# Altium PCB Board3ph.PcbDoc (part 2 of 4)
Units mil, origin at the board's own origin, x right, y up, seen from the top; angles counter-clockwise.
Board outline 2522.05 x 3126.78 mil, 4 copper layers (Top Layer, Mid Layer, Mid Layer 2, Bottom Layer), stack 61.653 mil thick; 132 components, 105 nets, 468 pads, 161 vias.
Unrouted connection lines stored in the file: 3.
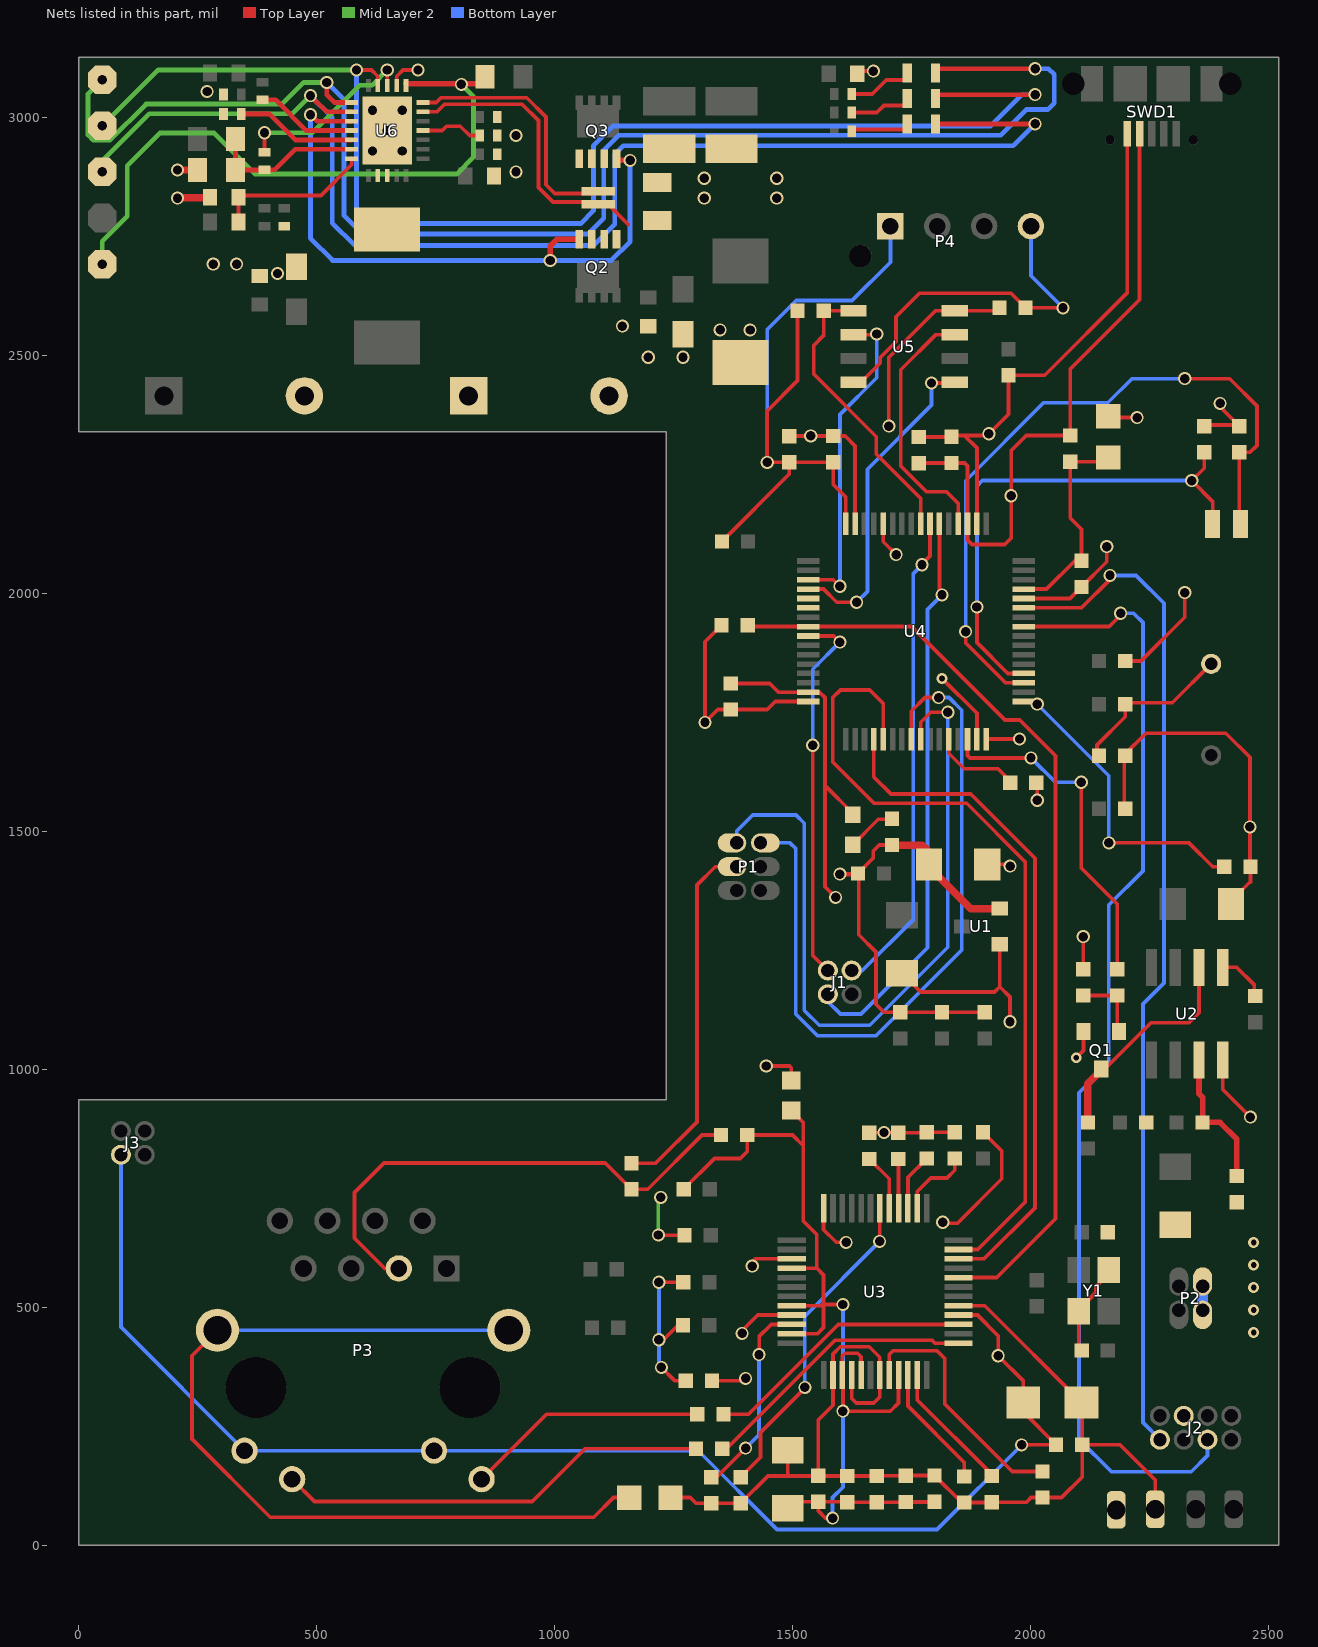
[diagram p4: the nets of this part, all layers, seen from the top]

## Part data (continued)
P3: "CONN MAGJACK 1PORT 100 BASE-T", Supplier Part Number 1=1278-1011-ND, Temperature="0°C to +70°C", Temperature Range High=+70°C, Temperature Range Low=0°C, ComponentLink1Description=Upverter, ComponentLink1URL=https://upverter.com/upn/revision/a90ddcab053b3c09/, ComponentLink2Description=Datasheet, ComponentLink2URL=http://www.shopwiznet.com/lanotattachments/download/file/id/95/store/1/, RoHS=TRUE, Supplier 1=Digi-Key, Supplier 2=Mouser, Supplier Part Number 2=950-RB1-125BAG1A
P4: "Connector Header Through Hole 4 position 0.098\" (2.50mm)", Manufacturer=Molex, Manufacturer Part Number=207843-0004, Supplier Part Number 1=900-2078430004-ND, Supplier 1=Digi-Key, Supplier Packaging 1=Tray, Supplier Unit Price 1=$0.43
Q1: "MOSFET N-CH 60V 115MA SOT23-3", Manufacturer_Name="Diodes Inc.", Manufacturer_Part_Number=DMN65D8L-7, Mouser Part Number=621-DMN65D8L-7, Supplier Part Number 1=2N7002E-T1-E3CT-ND, Datasheet Link=https://www.diodes.com/assets/Datasheets/DMN65D8L.pdf, Height=1mm, Supplier 1=Digi-Key
Q2 Q3: "MOSFET N-CH 40V 40A PPAK1212-8", LCSC Part Number=C511037, Manufacturer="Vishay Semiconductors", ComponentLink1Description=https://datasheet.ciiva.com/24101/sis488dn-267694-24101036.pdf?src-supplier=Mouser, ComponentLink1URL=https://datasheet.ciiva.com/24101/sis488dn-267694-24101036.pdf?src-supplier=Mouser, ComponentLink2Description=https://datasheet.ciiva.com/29742/sis488dn-29742161.pdf?src-supplier=Digikey, ComponentLink2URL=https://datasheet.ciiva.com/29742/sis488dn-29742161.pdf?src-supplier=Digikey, Item Type=MOSFETs, Manufacturer Part Number=SIS488DN-T1-GE3, Pricing="1=1.0926, 10=1.0325, 25=0.9922, 50=0.9525, 100=0.9137, 250=0.9045, 500=0.8952, 1000=0.8863 (USD)", RoHS=Yes, Stock=2575, Supplier="Arrow Electronics"
R1: library part R-1608, "0 Ohms Jumper 0.1W, 1/10W Chip Resistor 0603 (1608 Metric) Moisture Resistant Thick Film", Case Code (Metric)=1608, Manufacturer=Yageo, Manufacturer Part Number=RC0603JR-070RL, Power Rating=100mW, Supplier Part Number 1=311-0.0GRDKR-ND, Temperature Coefficient=200ppm/°C, Tolerance=1%, Voltage Rating=50V, Category="Chip SMD Resistors", Composition="Thick Film", Supplier 1=Digi-Key, Supplier Unit Price 1=$0.00347
R2: library part "22K Ohm 0.5% 1/16W 0603", "RES SMD 22K OHM 0.5% 1/16W 0603", Case Code (Metric)=1608, Manufacturer=Susumu, Manufacturer Part Number=RR0816P-223-D, Max Power Dissipation=63mW, Power Rating=62.5mW, Resistance=22kR, Supplier Part Number 1=RR08P22.0KDCT-ND, Temperature Coefficient=25ppm/°C, Tolerance=0.5%, Voltage Rating=75V, Category="Chip SMD Resistors", Supplier 1=Digi-Key, Supplier Unit Price 1=$0.01237
R3: library part RES, "Gen Purp Chip, R0603 0.1W 5%", Case Code (Metric)=1608, Manufacturer="TE Connectivity", Manufacturer Part Number=CRGCQ0603J330R, Max Power Dissipation=100mW, PartNumber=ERJ3GEYJ101V, Supplier Part Number 1=A130088CT-ND, Temperature Coefficient=100ppm/°C, Voltage=75, ComponentLink1Description=https://www.te.com/commerce/DocumentDelivery/DDEController?Action=srchrtrv&amp;DocNm=1773204-3&amp;DocType=DS&amp;DocLang=English&src-supplier=Digi-Key, ComponentLink1URL=https://www.te.com/commerce/DocumentDelivery/DDEController?Action=srchrtrv&amp;DocNm=1773204-3&amp;DocType=DS&amp;DocLang=English&src-supplier=Digi-Key, Component SubKind=Resistor, Component Type=Standard, Composition="Thick Film", Material=Thick-Film, MetricFootprint=R1608MM, Pin Count=2, Published=7/16/2009, Publisher=AltiumDBManager1.1, Resistance=330R, RoHS=Yes, Supplier 1=Digi-Key, Watts=0.1W
R4 R6: library part RES1, "RES SMD 100K OHM 1% 1/4W 0603", Case Code (Metric)=1608, Manufacturer="Vishay Dale", Manufacturer Part Number=RCA0603100KFKEAHP, Max Power Dissipation=250mW, Resistance=100kR, Supplier Part Number 1=541-3247-1-ND, Temperature Coefficient=100ppm/°C, Tolerance=1%, ComponentLink1Description=http://www.vishay.com/docs/20067/rcahp.pdf?src-supplier=Digi-Key, ComponentLink1URL=http://www.vishay.com/docs/20067/rcahp.pdf?src-supplier=Digi-Key, Composition="Thick Film", Supplier 1=Digi-Key, Supplier Unit Price 1=$0.03376
R5: library part RES1, "RES SMD 715K OHM 1% 1/10W 0603", Case Code (Metric)=1608, Manufacturer=Yageo, Manufacturer Part Number=RC0603FR-07402KL, Max Power Dissipation=100mW, Resistance=402kR, Resistor Type="Thick Film", Supplier Part Number 1=311-402KHRCT-ND, Temperature Coefficient=100ppm/°C, Tolerance=1%, Voltage Rating (DC)=50V, Category="Chip SMD Resistors", Size Code=0603, Supplier 1=Digi-Key, Supplier Unit Price 1=$0.10
R7 R8 R9 R10 R11 R12 R13 R14 R15 R16 R17 R21 R27: library part RES1, "RES SMD 10K OHM 0.5% 1/16W 0603", Case Code (Metric)=1608, Manufacturer=Susumu, Manufacturer Part Number=RR0816P-103-D, Max Power Dissipation=63mW, Resistance=10kR, Supplier Part Number 1=RR08P10.0KDCT-ND, Tolerance=0.5%, Category="Chip SMD Resistors", Supplier 1=Digi-Key, Supplier Unit Price 1=$0.0136, Termination=SMD/SMT
R18 R19 R24 R25: library part R-1608, "RES SMD 49.9 OHM 1% 1/10W 0603", Case Code (Metric)=1608, Manufacturer=Yageo, Manufacturer Part Number=RC0603FR-0749R9L, Power Rating=100mW, Resistance=49.9R, Supplier Part Number 1=311-49.9HRDKR-ND, Temperature Coefficient=100ppm/°C, Tolerance=1%, Voltage Rating=50V, Category="Chip SMD Resistors", Supplier 1=Digi-Key, Supplier Unit Price 1=$0.00366
R20: library part R-1608, "RES SMD 10 OHM 1% 1/10W 0603", Case Code (Metric)=1608, Manufacturer=Yageo, Manufacturer Part Number=RC0603FR-0710RL, Resistance=10R, Supplier Part Number 1=311-10.0HRCT-ND, Temperature Coefficient=200ppm/°C, Tolerance=1%, Category="Chip SMD Resistors", Supplier 1=Digi-Key, Supplier Unit Price 1=$0.00729
R22: library part R-1608, "Resistor CRGCQ 0603 1M0 5%", Case Code (Metric)=1608, Manufacturer="TE Connectivity", Manufacturer Part Number=CRGCQ0603J1M0, Max Power Dissipation=100mW, Resistance=1MR, Supplier Part Number 1=A130109CT-ND, Temperature Coefficient=100ppm/°C, Tolerance=5%, Composition="Thick Film", Supplier 1=Digi-Key, Supplier Unit Price 1=$0.00336
R23: library part R-1608, "RESISTOR 0603 12.4K 1%", Supplier Part Number 1=P12.4KHCT-ND, Supplier 1=Digi-Key
R26 R28: library part R-1608, "330 Ohms ±5% 0.1W, 1/10W Chip Resistor 0603", Case Code (Metric)=1608, Manufacturer="TE Connectivity", Manufacturer Part Number=CRGCQ0603J330R, Max Power Dissipation=100mW, Supplier Part Number 1=A130088CT-ND, Tolerance=5%, Composition="Thick Film", Supplier 1=Digi-Key, Supplier Unit Price 1=$0.00336
R29: library part RES, "220 Ohms ±1% 0.1W, 1/10W Chip Resistor 0603 (1608 Metric) Moisture Resistant Thick Film", Case Code (Metric)=1608, Manufacturer=Yageo, Manufacturer Part Number=RC0603FR-07220RL, Max Power Dissipation=100mW, Supplier Part Number 1=311-220HRCT-ND, Tolerance=1%, Voltage Rating=50V, Category="Chip SMD Resistors", Supplier 1=Digi-Key, Supplier Unit Price 1=$0.00366
R30: library part PRL0816-R010-F-T1, "Current Sense Resistors - SMD 1/3W 0.01ohm 1%", Manufacturer=Susumu, Max Operating Temperature=125°C, Min Operating Temperature=-40°C, Supplier Part Number=754-PRL0816-R010-FT1, ComponentLink1Description=http://www.mouser.com/ds/2/392/n_catalog_partition07_en-1114612.pdf?src-supplier=Mouser, ComponentLink1URL=http://www.mouser.com/ds/2/392/n_catalog_partition07_en-1114612.pdf?src-supplier=Mouser, Item Type=Resistors, Lead Free=5697LeadFree, Manufacturer Part Number=PRL0816-R010-F-T1, Pricing="1=0.6, 10=0.429, 50=0.429, 100=0.224, 1000=0.183, 10000=0.116 (USD)", RoHS=Yes, Stock=4570, Supplier=Mouser
R31: library part RT0603BRE07113KL, "RES SMD 113K OHM 0.1% 1/10W 0603", Case/Package=0603, LCSC Part Number=C861633, Manufacturer=Yageo, Max Operating Temperature=155°C, Max Power Dissipation=100mW, Min Operating Temperature=-55°C, Temperature Coefficient=50ppm/°C, Tolerance=0.1%, Voltage Rating (DC)=50V, ComponentLink1Description=https://datasheet.ciiva.com/2584/pyu-rt-1-to-0-05-rohs-l-5-2584176.pdf?src-supplier=Digikey, ComponentLink1URL=https://datasheet.ciiva.com/2584/pyu-rt-1-to-0-05-rohs-l-5-2584176.pdf?src-supplier=Digikey, Item Type=Resistors, Lead Free="Lead Free", Manufacturer Part Number=RT0603BRE07113KL, Number of Terminations=2, Packaging="Tape and Reel", Pricing="5000=0.04488 (USD)", RoHS=Yes, RoHS Compliant=Yes, Series=RT, Supplier=Digikey
R32 R33: library part RES1, "RES SMD 100K OHM 1% 1/4W 0603", Case Code (Metric)=1608, Manufacturer="Vishay Dale", Manufacturer Part Number=RCA0603100KFKEAHP, Max Power Dissipation=250mW, Resistance=100kR, Supplier Part Number 1=541-3247-1-ND, Tolerance=1%, Supplier 1=Digi-Key, Supplier Unit Price 1=$0.03376
R34: library part "100 Ohm 5% 1/10W 0603", "RES 100 OHM 5% 1/10W 0603", Case Code (Metric)=1608, Manufacturer="Stackpole Electronics", Manufacturer Part Number=RMCF0603JT100R, Supplier Part Number 1=RMCF0603JT100RCT-ND, Temperature Coefficient=100ppm/°C, Tolerance=5%, Features="Automotive AEC-Q200", Resistance=100R, Supplier 1=Digi-Key, Supplier Unit Price 1=$0.00207
R35: library part "4K7 Ohm 5% 1/10W 0603", "RES 4.7K OHM 5% 1/10W 0603", Case Code (Imperial)=0603, Manufacturer="Stackpole Electronics", Manufacturer Part Number=RMCF0603JT4K70, Max Power Dissipation=100mW, Supplier Part Number 1=RMCF0603JT4K70CT-ND, Temperature Coefficient=200ppm/°C, Category="Chip SMD Resistors", Features="Automotive AEC-Q200", Supplier 1=Digi-Key, Supplier Unit Price 1=$0.00207
R36: library part RC0402FR-076K2L, "RES 6.2K OHM 1% 1/16W 0402", Case Code (Imperial)=0402, Case Code (Metric)=1005, LCSC Part Number=C137946, Manufacturer=Yageo, Max Operating Temperature=155°C, Max Power Dissipation=63mW, Min Operating Temperature=-55°C, Package Quantity=1, Resistance Tolerance=1%, Resistor Type="Thick Film", Temperature Coefficient=100ppm/°C, Voltage Rating=50V, Case/Package=0402, ComponentLink1Description=https://datasheet.ciiva.com/7850/1018594-7850076.pdf?src-supplier=Element14, ComponentLink1URL=https://datasheet.ciiva.com/7850/1018594-7850076.pdf?src-supplier=Element14, ComponentLink2Description=https://datasheet.ciiva.com/7850/1018594-7850077.pdf?src-supplier=Element14, ComponentLink2URL=https://datasheet.ciiva.com/7850/1018594-7850077.pdf?src-supplier=Element14, Construction=Rectangular, Depth=0.5mm, Features="Moisture Resistant", Height=0.016inch, Item Type=Resistors, Lead Free="Lead Free", Length=1mm, Manufacturer Part Number=RC0402FR-076K2L, Military Standard=Not, Number of Terminations=2, Packaging="Tape and Reel", Power Rating=63mW, Pricing="100=0.034, 1000=0.032, 2500=0.031, 5000=0.028, 10000=0.026 (DKK)", Reach SVHC Compliant=Unknown, RoHS=Yes, RoHS Compliant=Yes, Series=RC, Stock=13400, Supplier=Rs, Termination=SMD/SMT, Tolerance=1%, Voltage Rating (DC)=50V, Width=0.02inch
R37: library part RT0603BRD0738K3L, "RES SMD 38.3KOHM 0.1% 1/10W 0603", LCSC Part Number=C861362, Manufacturer=Yageo, ComponentLink1Description=https://datasheet.ciiva.com/8889/pyu-rt-1-to-0-05-rohs-l-4-8889401.pdf?src-supplier=Avnet, ComponentLink1URL=https://datasheet.ciiva.com/8889/pyu-rt-1-to-0-05-rohs-l-4-8889401.pdf?src-supplier=Avnet, ComponentLink2Description=https://datasheet.ciiva.com/2585/pyu-rt-1-to-0-05-rohs-l-5-2585913.pdf?src-supplier=Digikey, ComponentLink2URL=https://datasheet.ciiva.com/2585/pyu-rt-1-to-0-05-rohs-l-5-2585913.pdf?src-supplier=Digikey, Item Type=Resistor, Manufacturer Part Number=RT0603BRD0738K3L, Pricing="1=0.0648, 10=0.0429, 25=0.0356, 100=0.0309, 250=0.0306, 500=0.0231, 1000=0.0223, 3000=0.0214 (USD)", RoHS=Yes, Stock=3002, Supplier="Arrow Electronics"
R38 R44: library part AC0805FR-071M05L, "RES 1.05 MOHM 1% 1/8W 0805", LCSC Part Number=C228592, Manufacturer=Yageo, Category="Chip SMD Resistors", Manufacturer Part Number=AC0805FR-071M05L, Pricing="5000=0.00714 (USD)", RoHS=Yes, RoHS Compliant=Yes, Supplier=Digikey
R39 R45 R47 R49: library part RC0402FR-070RL, "RES 0 OHM JUMPER 1/16W 0402", Case Code (Imperial)=0402, Case Code (Metric)=1005, LCSC Part Number=C106231, Manufacturer=Yageo, Max Operating Temperature=155°C, Max Power Dissipation=63mW, Min Operating Temperature=-55°C, Power Rating=62.5mW, Resistor Type="Thick Film", Supplier Part Number 1=603-RC0402FR-070RL, Temperature Coefficient=200ppm/°C, Tolerance=1%, Voltage Rating=50V, Case/Package=0402, ComponentLink1Description=https://datasheet.ciiva.com/8896/pyu-rc0402-51-rohs-l-6-8896149.pdf?src-supplier=Avnet, ComponentLink1URL=https://datasheet.ciiva.com/8896/pyu-rc0402-51-rohs-l-6-8896149.pdf?src-supplier=Avnet, ComponentLink2Description=https://datasheet.ciiva.com/16790/pyu-rc0402-51-rohs-l-6-r-16790444.pdf?src-supplier=Future+Electronics, ComponentLink2URL=https://datasheet.ciiva.com/16790/pyu-rc0402-51-rohs-l-6-r-16790444.pdf?src-supplier=Future+Electronics, Contact Plating=Tin,Matte, Features="Moisture Resistant", Height=0.35mm, Item Type=Resistors, Lead Free="Lead Free", Length=1mm, Manufacturer Part Number=RC0402FR-070RL, Mount="Surface Mount", Number of Terminations=2, Packaging="Tape and Reel", Pricing 1="1=0.10000, 10=0.01400, 50=0.01400, 100=0.00600, 1000=0.00300, 5000=0.00200, 10000=0.00100 (USD)", Radiation Hardening=No, Resistance=0R, RoHS=Yes, RoHS Compliant=Yes, Series=RC, Size Code=0402, Stock 1=8556842, Supplier 1=Mouser, Termination=SMD/SMT, Width=0.5mm
R40 R41 R42: library part RC0402FR-071K5L, "RES 1.5K OHM 1% 1/16W 0402", Case Code (Imperial)=0402, Case Code (Metric)=1005, LCSC Part Number=C114759, Manufacturer=Yageo, Max Operating Temperature=155°C, Max Power Dissipation=63mW, Min Operating Temperature=-55°C, Package Quantity=1, Power Rating=62.5mW, Resistance=1.5kR, Resistance Tolerance=1%, Resistor Type="Thick Film", Supplier Part Number 1=311-1.50KLRCT-ND, Temperature Coefficient=100ppm/°C, Voltage Rating=50V, Case/Package=0402, Category="Chip SMD Resistors", ComponentLink1Description=https://datasheet.ciiva.com/11808/0900766b80c66297-11808238.pdf?src-supplier=RSComponents, ComponentLink1URL=https://datasheet.ciiva.com/11808/0900766b80c66297-11808238.pdf?src-supplier=RSComponents, ComponentLink2Description=https://datasheet.ciiva.com/46394/1018594-46394950.pdf?src-supplier=Element14, ComponentLink2URL=https://datasheet.ciiva.com/46394/1018594-46394950.pdf?src-supplier=Element14, ComponentLink3Description=https://datasheet.ciiva.com/2453/pyu-r-int-thick-7-2453440.pdf?src-supplier=Digi-Key, ComponentLink3URL=https://datasheet.ciiva.com/2453/pyu-r-int-thick-7-2453440.pdf?src-supplier=Digi-Key, ComponentLink4Description=https://datasheet.ciiva.com/2453/pyu-r-int-thick-7-2453441.pdf?src-supplier=Digi-Key, ComponentLink4URL=https://datasheet.ciiva.com/2453/pyu-r-int-thick-7-2453441.pdf?src-supplier=Digi-Key, ComponentLink5Description=https://datasheet.ciiva.com/2453/pyu-r-int-thick-7-2453439.pdf?src-supplier=Digi-Key, ComponentLink5URL=https://datasheet.ciiva.com/2453/pyu-r-int-thick-7-2453439.pdf?src-supplier=Digi-Key, ComponentLink6Description=https://datasheet.ciiva.com/12558/pyu-rc0402-51-rohs-l-6-r-8721-12558542.pdf?src-supplier=Mouser, ComponentLink6URL=https://datasheet.ciiva.com/12558/pyu-rc0402-51-rohs-l-6-r-8721-12558542.pdf?src-supplier=Mouser, ComponentLink7Description=https://datasheet.ciiva.com/7849/1018594-7849863.pdf?src-supplier=Element14, ComponentLink7URL=https://datasheet.ciiva.com/7849/1018594-7849863.pdf?src-supplier=Element14, ComponentLink8Description=https://datasheet.ciiva.com/7849/1018594-7849864.pdf?src-supplier=Element14, ComponentLink8URL=https://datasheet.ciiva.com/7849/1018594-7849864.pdf?src-supplier=Element14, ComponentLink9Description=https://datasheet.ciiva.com/15189/getdatasheetpartid-323992-15189370.pdf?src-supplier=Verical, ComponentLink9URL=https://datasheet.ciiva.com/15189/getdatasheetpartid-323992-15189370.pdf?src-supplier=Verical, Construction=Rectangular, Depth=0.5mm, Features="Moisture Resistant", Height=0.016inch, Lead Free="Lead Free", Length=1mm, Manufacturer Part Number=RC0402FR-071K5L, Military Standard=Not, Number of Terminations=2, Packaging="Tape and Reel", Pricing 1="1=0.10000, 10=0.01500, 100=0.00610, 1000=0.00275, 2500=0.00239, 5000=0.00197 (USD)", REACH SVHC="No SVHC", RoHS=Yes, RoHS Compliant=Yes, Series=RC, Size Code=0402, Stock 1=2832947, Supplier 1=Digi-Key, Technology="THICK FILM", Termination=SMD/SMT, Tolerance=1%, Width=0.02inch
R43: library part RT0805BRD07200KL, "RES SMD 200K OHM 0.1% 1/8W 0805", LCSC Part Number=C728645, Manufacturer=Yageo, ComponentLink1Description=https://datasheet.ciiva.com/8886/pyu-rt-1-to-0-05-rohs-l-4-8886959.pdf?src-supplier=Avnet, ComponentLink1URL=https://datasheet.ciiva.com/8886/pyu-rt-1-to-0-05-rohs-l-4-8886959.pdf?src-supplier=Avnet, ComponentLink2Description=https://datasheet.ciiva.com/2584/pyu-rt-1-to-0-05-rohs-l-5-2584830.pdf?src-supplier=Digikey, ComponentLink2URL=https://datasheet.ciiva.com/2584/pyu-rt-1-to-0-05-rohs-l-5-2584830.pdf?src-supplier=Digikey, Item Type=Resistors, Manufacturer Part Number=RT0805BRD07200KL, Pricing="10=0.242, 100=0.471, 250=0.396, 500=0.322, 1000=0.262 (DKK)", RoHS=Yes, Stock=2060, Supplier=Rs
R46: library part RC0603FR-071M5L, "RES SMD 1.5M Ohm 1% 0.1W(1/10W)  0603", Case Code (Imperial)=0603, Case Code (Metric)=1608, LCSC Part Number=C137773, Manufacturer=Yageo, Max Operating Temperature=155°C, Max Power Dissipation=100mW, Min Operating Temperature=-55°C, Resistance=1.5MR, Resistance Tolerance=1%, Resistor Type="Thick Film", Supplier Part Number 1=311-1.50MHRCT-ND, Temperature Coefficient=100ppm/°C, Voltage Rating=75V, Voltage Rating (DC)=50V, Case/Package=0603, Category="Chip SMD Resistors", ComponentLink1Description=https://datasheet.ciiva.com/11819/0900766b80f96399-11819294.pdf?src-supplier=RSComponents, ComponentLink1URL=https://datasheet.ciiva.com/11819/0900766b80f96399-11819294.pdf?src-supplier=RSComponents, ComponentLink2Description=https://datasheet.ciiva.com/7746/443971-7746285.pdf?src-supplier=Element14, ComponentLink2URL=https://datasheet.ciiva.com/7746/443971-7746285.pdf?src-supplier=Element14, ComponentLink3Description=https://datasheet.ciiva.com/7746/443971-7746284.pdf?src-supplier=Element14, ComponentLink3URL=https://datasheet.ciiva.com/7746/443971-7746284.pdf?src-supplier=Element14, Construction=Rectangular, Depth=0.8mm, Features="Moisture Resistant", Height=0.45mm, Lead Free="Lead Free", Length=1.6mm, Manufacturer Part Number=RC0603FR-071M5L, Military Standard=Not, Number of Pins=2, Number of Terminations=2, Packaging="Tape and Reel", Power Rating=100mW, Pricing 1="1=0.10000, 10=0.02400, 100=0.00970, 1000=0.00436, 2500=0.00378 (USD)", REACH SVHC="No SVHC", RoHS=Yes, RoHS Compliant=Yes, Series=RC, Size Code=0603, Stock 1=211390, Supplier 1=Digi-Key, Technology="THICK FILM", Termination=SMD/SMT, Tolerance=1%, Weight=7.1E-05oz, Width=0.8mm
R48: library part RC0402FR-07261KL, "RES 261K OHM 1% 1/16W 0402", LCSC Part Number=C185437, Manufacturer=Yageo, Voltage Rating (DC)=50V, ComponentLink1Description=https://datasheet.ciiva.com/8886/pyu-rc0402-51-rohs-l-6-8886524.pdf?src-supplier=Avnet, ComponentLink1URL=https://datasheet.ciiva.com/8886/pyu-rc0402-51-rohs-l-6-8886524.pdf?src-supplier=Avnet, ComponentLink2Description=https://datasheet.ciiva.com/17419/pyu-rc0402-51-rohs-l-6-r-17419487.pdf?src-supplier=Future+Electronics, ComponentLink2URL=https://datasheet.ciiva.com/17419/pyu-rc0402-51-rohs-l-6-r-17419487.pdf?src-supplier=Future+Electronics, Item Type=Resistors, Lead Free=5697LeadFree, Manufacturer Part Number=RC0402FR-07261KL, Pricing="10000=0.00085 (USD)", RoHS=Yes, Stock=30000, Supplier=Avnet, Supplier Part Number=RC0402FR-07261KL
R50: library part RC0402FR-072K49L, "RES 2.49K OHM 1% 1/16W 0402", Case Code (Imperial)=0402, Case Code (Metric)=1005, LCSC Part Number=C145071, Manufacturer=Yageo, Max Operating Temperature=155°C, Max Power Dissipation=63mW, Min Operating Temperature=-55°C, Package Quantity=1, Power Rating=62.5mW, Resistance Tolerance=1%, Resistor Type="Thick Film", Supplier Part Number=7635139, Temperature Coefficient=100ppm/°C, Voltage Rating=50V, Case/Package=0402, ComponentLink1Description=https://datasheet.ciiva.com/2518/pyu-r-int-thick-7-2518986.pdf?src-supplier=Digikey, ComponentLink1URL=https://datasheet.ciiva.com/2518/pyu-r-int-thick-7-2518986.pdf?src-supplier=Digikey, ComponentLink2Description=https://datasheet.ciiva.com/2518/pyu-r-int-thick-7-2518987.pdf?src-supplier=Digikey, ComponentLink2URL=https://datasheet.ciiva.com/2518/pyu-r-int-thick-7-2518987.pdf?src-supplier=Digikey, ComponentLink3Description=https://datasheet.ciiva.com/7983/1018594-7983516.pdf?src-supplier=Element14, ComponentLink3URL=https://datasheet.ciiva.com/7983/1018594-7983516.pdf?src-supplier=Element14, ComponentLink4Description=https://datasheet.ciiva.com/2518/pyu-r-int-thick-7-2518985.pdf?src-supplier=Digikey, ComponentLink4URL=https://datasheet.ciiva.com/2518/pyu-r-int-thick-7-2518985.pdf?src-supplier=Digikey, ComponentLink5Description=https://datasheet.ciiva.com/5558/pyu-rc0402-51-rohs-l-6-r-5558122.pdf?src-supplier=Mouser, ComponentLink5URL=https://datasheet.ciiva.com/5558/pyu-rc0402-51-rohs-l-6-r-5558122.pdf?src-supplier=Mouser, Contact Plating=Tin,Lead, Features="Moisture Resistant", Height=0.016inch, Item Type=Resistors, Lead Free="Lead Free", Length=0.039inch, Manufacturer Part Number=RC0402FR-072K49L, Number of Terminations=2, Packaging="Tape and Reel", Pricing="10000=0.0012, 100000=0.0011, 300000=0.001, 750000=0.001, 2000000=0.0009 (USD)", Reach SVHC Compliant=No, RoHS=Yes, RoHS Compliant=Yes, Series=RC, Stock=530000, Supplier="Future Electronics", Termination=SMD/SMT, Tolerance=1%, Voltage Rating (DC)=50V, Width=0.02inch
R51: library part RC0402FR-070RL, "RES 0 OHM JUMPER 1/16W 0402", Case Code (Imperial)=0402, Case Code (Metric)=1005, LCSC Part Number=C106231, Manufacturer=Yageo, Max Operating Temperature=155°C, Max Power Dissipation=63mW, Min Operating Temperature=-55°C, Power Rating=62.5mW, Resistance=0R, Resistor Type="Thick Film", Supplier Part Number 1=603-RC0402FR-070RL, Temperature Coefficient=200ppm/°C, Tolerance=1%, Voltage Rating=50V, Case/Package=0402, ComponentLink1Description=https://datasheet.ciiva.com/8896/pyu-rc0402-51-rohs-l-6-8896149.pdf?src-supplier=Avnet, ComponentLink1URL=https://datasheet.ciiva.com/8896/pyu-rc0402-51-rohs-l-6-8896149.pdf?src-supplier=Avnet, ComponentLink2Description=https://datasheet.ciiva.com/16790/pyu-rc0402-51-rohs-l-6-r-16790444.pdf?src-supplier=Future+Electronics, ComponentLink2URL=https://datasheet.ciiva.com/16790/pyu-rc0402-51-rohs-l-6-r-16790444.pdf?src-supplier=Future+Electronics, Contact Plating=Tin,Matte, Features="Moisture Resistant", Height=0.35mm, Item Type=Resistors, Lead Free="Lead Free", Length=1mm, Manufacturer Part Number=RC0402FR-070RL, Mount="Surface Mount", Number of Terminations=2, Packaging="Tape and Reel", Pricing 1="1=0.10000, 10=0.01400, 50=0.01400, 100=0.00600, 1000=0.00300, 5000=0.00200, 10000=0.00100 (USD)", Radiation Hardening=No, RoHS=Yes, RoHS Compliant=Yes, Series=RC, Size Code=0402, Stock 1=8556842, Supplier 1=Mouser, Termination=SMD/SMT, Width=0.5mm
SWD1: "CONN RCPT MICRO USB AB R/A SMD", Contact Resistance=40mR, Current Rating=1.8A, Manufacturer=Molex, Manufacturer Part Number=47589-0001, Supplier Part Number 1=WM17143CT-ND, Category="USB Connectors", ComponentLink1Description=https://datasheet.ciiva.com/16148/0475890001-io-connectors-16148921.pdf?src-supplier=Onlinecomponents.com, ComponentLink1URL=https://datasheet.ciiva.com/16148/0475890001-io-connectors-16148921.pdf?src-supplier=Onlinecomponents.com, Gender=Female, Mount="Surface Mount,PCB", Number of Contacts=5, Orientation="Right Angle", Supplier 1=Digi-Key, Supplier Unit Price 1=$0.48114
TP1 TP2 TP3 TP4 TP5: "Test Point ON", Item Type="TEST POINT"
U1: library part MCP1700T-3302E/TT, "Voltage Regulator; LDO; SOT-23; PD 369.6mW; VO 3.3V; Regline +/-0.75%/V", Manufacturer=Microchip, Supplier Part Number 1=MCP1700T3302ETTCT-ND, Category="Voltage Regulators - Linear", ComponentLink1Description=https://datasheet.ciiva.com/2040/21826b-2040112.pdf?src-supplier=Digi-Key, ComponentLink1URL=https://datasheet.ciiva.com/2040/21826b-2040112.pdf?src-supplier=Digi-Key, Manufacturer Part Number=MCP1700T-3302E/TT, Supplier 1=Digi-Key, Supplier Unit Price 1=$0.28
U2: library part RT9025-25GSP, "High performance 2A ULDO linear regulator", Case/Package=SOIC, Dropout Voltage=230mV, Manufacturer=Richtek, Max Input Voltage=5V, Max Output current=2A, Supplier Part Number 1=1028-1009-2-ND, Category="Voltage Regulators - Linear", Manufacturer Part Number=RT9025-25GSP, Output Current=2A, Supplier 1=Digi-Key, Supplier Unit Price 1=$0.33814
U3: "Ethernet Controller 10/100 Base-T/TX PHY SPI Interface", Case/Package=LQFP, Manufacturer=WIZnet, Max Supply Current=132mA, Max Supply Voltage=3.63V, Min Supply Voltage=2.97V, Supplier Part Number 1=1278-1021-ND, Category="Integrated Circuits (ICs)", DeviceSetName=W5500, Interface=SPI, LibraryName=WIZnet, Manufacturer Part Number=W5500, Supplier 1=Digi-Key, SymbolName_1=W5500
U4: library part STM32L152RCT6, "IC MCU 32BIT 512KB FLASH 64LQFP", Case/Package=LQFP, Frequency=32MHz, Manufacturer=STMicroelectronics, Max Supply Voltage=3.6V, Min Supply Voltage=1.8V, Supplier Part Number 1=497-17527-ND, Category=Microcontrollers, Core Architecture=ARM, Manufacturer Part Number=STM32L151RET6, Memory Size=512KB, RAM Size=80KB, Supplier 1=Digi-Key
U5: "EEPROM Memory IC 2Mb _256K x 8_ SPI 5MHz 8-SO", Case Code (Metric)=SOIC-8, Manufacturer=STMicroelectronics, Manufacturer Part Number=M95M02-DWMN3TP/K, Supplier Part Number 1=497-15597-2-ND, ComponentLink1Description=Supplier, ComponentLink1URL=https://www.digikey.fr/product-detail/fr/stmicroelectronics/M95M04-DRMN6TP/497-M95M04-DRMN6TPDKR-ND/11482714, ComponentLink2Description=Datasheet, ComponentLink2URL=https://www.st.com/resource/en/datasheet/m95m04-dr.pdf, Memory Format=EEPROM, Memory Size=2Mb, Supplier 1=Digi-Key, Supplier Unit Price 1=$2.15
U6: "IC BATT PWR MGMT MULTI 1C 24QFN", LCSC Part Number=C3151895, Manufacturer="Analog Devices / Linear Technology", Max Operating Temperature=125°C, Max Supply Voltage=5.5V, Min Operating Temperature=-40°C, Min Supply Voltage=2.9V, Output Current=2.5A, ComponentLink1Description=http://www.analog.com/media/en/technical-documentation/data-sheets/LTC4041.pdf?src-supplier=Digikey, ComponentLink1URL=http://www.analog.com/media/en/technical-documentation/data-sheets/LTC4041.pdf?src-supplier=Digikey, ComponentLink2Description=https://datasheet.octopart.com/LTC4041EUFD%23PBF-Analog-Devices-datasheet-138896410.pdf?src-supplier=Element14, ComponentLink2URL=https://datasheet.octopart.com/LTC4041EUFD%23PBF-Analog-Devices-datasheet-138896410.pdf?src-supplier=Element14, Height=800um, Item Type=IC, Manufacturer Part Number=LTC4041EUFD#PBF, Number of Cells=2NUMBER, Number of Outputs=1NUMBER, Pins=24NUMBER, Pricing="1=9.86, 10=7.01, 50=6.22, 100=4.91, 1000=4.43, 10000=4.43 (USD)", RoHS=Yes, Stock=15485, Supplier=Mouser
X1: library part XTAL, "8MHz ±30ppm Crystal 20pF 80 Ohms HC-49/US", Manufacturer="Fox Electronics", Manufacturer Part Number=FC4STCBMF8.0-BAG200, Supplier 1=Arrow, Supplier Part Number 1=FC4STCBMF8.0-BAG200, Supplier Unit Price 1=$0.2273
Y1: library part XTAL3225, "CRYSTAL 25.0000MHZ 8PF SMD", Case/Package=SMD/SMT, ESR (Equivalent Series Resistance)=100R, Frequency Stability=50ppm, Load Capacitance=8pF, Manufacturer="Kyocera AVX", Manufacturer Part Number=CX3225CA25000D0HSSCC, Supplier Part Number 1=1253-1142-1-ND, Tolerance=20ppm, ComponentLink1Description=Supplier, ComponentLink1URL=https://www.digikey.com/product-detail/en/kyocera-international-inc-electronic-components/CX3225CA25000D0HSSCC/1253-1142-1-ND/4453960, Frequency=25MHz, Supplier 1=Digi-Key
Y2: "ABS25 Series 32.768 kHz Â±20 ppm 6 pF -40 to +85 Â°C SMT Low Frequency Crystal", Case/Package=SMD/SMT, Frequency=32.768kHz, Frequency Tolerance=20ppm, Load Capacitance=9pF, Manufacturer="Micro Crystal", Manufacturer Part Number="CM8V-T1A 32.768kHz 9pF +/-20ppm TA QC", Max Operating Temperature=85°C, Min Operating Temperature=-40°C, Supplier Part Number 1=2195-CM8V-T1A-32.768KHZ-9PF-20PPM-TA-QCCT-ND, Length=2mm, Supplier 1=Digi-Key, Supplier Unit Price 1=$0.66

## Free pads (board coordinates)
  rrect50% 39.37x78.74 hole 39.37: 1(2427.17,75.94) 2(2347.17,75.94) 3(2179.92,74.41) 3(2262.17,75.94)

## Via types
v1: diameter 27.56, hole 19.68, Top Layer to Bottom Layer, 151 vias
v2: diameter 23.62, hole 11.81, Top Layer to Bottom Layer, 6 vias
v3: diameter 27.56, hole 19.68, Top Layer to Bottom Layer, tented both sides, 2 vias
v4: diameter 21.65, hole 11.81, Top Layer to Bottom Layer, 1 vias
v5: diameter 31.5, hole 15.75, Top Layer to Bottom Layer, 1 vias

## Nets (pads, with @x,y where several pads share a name; then routed paths per layer and width w, separated by ;. In a path a pad name is that pad's centre, name@x,y a point inside that pad or via, vN(x,y) a via of type N, cw(c..) or ccw(c..) an arc to the next point about the centre after c; other vN are vias at no path point)
+3V3: C2.2 C4.1 C6.2 C7.2 C8.2 C10.1 C11.2 C14.1 C25.1 C26.2 J3.1 L1.1 L2.1 P3.L1 P3.L3 P4.1 pad.3@2179.92,74.41 R1.2 R3.1 R8.2 R14.2 R15.2 R16.2 R17.2 R21.2 R32.1 SWD1.4 U1.2 U3.28 U4.1 U4.19 U4.32 U4.48 U4.64 U5.8 | length 8794.6
  Top Layer w7.87: R21.2@1354.06,1936.34 R21.2@1350.79,1933.07 1316.14,1898.43 v1(1316.14,1729.19) 1342.86,1755.91 C8.2@1370.47,1755.91 ; R17.2@1359.84,2109.06 R17.2@1351.69,2109.06 1493.31,2250.67 C7.2@1493.31,2275.32 ; C8.2@1380.43,1755.91 1446.85,1755.91 1463.78,1772.83 U4.48@1533.07,1772.83 ; v1(1444.88,1007.09) 1493.7,1007.09 1497.24,1003.54 L1.1@1497.24,976.77 ; R32.1@1510.41,2593.7 1510.41,2447.11 1446.85,2383.54 v1(1446.85,2275.32) C7.2@1493.31,2275.32 ; U4.32@1611.81,2146.85 1611.81,2202.76 1585.83,2228.74 C6.2@1585.83,2275.71 1493.7,2275.71 C7.2@1493.31,2275.32 ; R1.2@1635.94,1410.14 R1.2@1637.46,1411.65 ; v1(1702.36,2351.46) 1702.36,2495.59 1800.47,2593.7 U5.8@1840.67,2593.7 1928.43,2593.7 C14.1@1934.71,2599.97 ; R3.1@1709.06,1471.38 1682.4,1471.38 1669.69,1458.66 1669.69,1443.88 R1.2@1637.46,1411.65 ; C11.2@1765.35,2273.74 1833.86,2273.74 C10.1@1834.25,2274.14 1861.57,2274.14 1867.71,2267.99 1867.71,2112.52 1877.41,2102.81 1945.75,2102.81 1959.45,2116.51 v1(1959.45,2205.12) 1959.45,2300.05 1991.29,2331.89 L2.1@2083.35,2331.89 2083.35,2471.39 2229.13,2617.18 SWD1.4@2229.13,2965.55 ; v1@1814.17,676.5 1846.06,676.5 1939.76,770.19 1939.76,828.62 R8.2@1900.39,867.99 R8.2@1900.39,873.25 ; U3.28@1848.82,483.86 1888.58,483.86 1932.28,440.16 1932.28,398.82 v1(1931.89,398.43) 1985.04,345.27 C25.1@1985.04,300.39 1985.04,279.92 C26.2@2053.54,211.42 1981.89,211.42 v1(1981.5,211.02) ; R16.2@1903.94,1119.96 R15.2@1814.17,1119.96 R14.2@1726.38,1119.96 1692.46,1119.96 1675.59,1136.83 1675.59,1246.45 1638.98,1283.07 1638.98,1410.14 R1.2@1637.46,1411.65 ; U4.64@1907.08,1694.09 1907.18,1694 v1(1977,1694) ; U4.1@1985.82,1772.83 2003.33,1772.83 2005.08,1771.09 2010.41,1771.09 v1(2014.17,1767.32) ; v1(2164.58,1475.91) 2332.9,1475.91 2382.9,1425.91 C2.2@2407.09,1425.91
  Top Layer w9.84: v1(1599.61,1410.14) R1.2@1635.94,1410.14
  Top Layer w15.75: R3.1@1709.06,1471.38 1773.06,1471.38 1782.28,1462.15 1782.28,1435.45 C4.1@1787.01,1430.73 1787.01,1424.82 1874.04,1337.8 U1.2@1935.43,1337.8
  Bottom Layer w7.87: J3.1@89.06,820.63 89.06,458.58 P3.L1@348.82,198.82 P3.L3@746.85,198.82 1301.97,198.82 1467.72,33.07 1803.54,33.07 v1(1981.5,211.02) ; v1(1446.85,2275.32) 1446.85,2554.34 1507.98,2615.47 1625.16,2615.47 1705.66,2695.97 P4.1@1705.66,2783.65 ; v1(2014.17,1767.32) 2164.58,1616.91 v1(2164.58,1475.91)
  other v1: 1815.69,678.73
+3V3A: C19.2 C20.2 C21.2 C22.2 C23.2 C37.1 L1.2 R18.2 R19.2 R20.2 U3.4 U3.8 U3.11 U3.15 U3.17 U3.21 | length 2401.9
  Top Layer w7.87: v1(1218.11,651.97) 1218.5,651.57 R19.2@1273.23,651.57 ; v1(1223.11,731.1) v1@1223.11,739.53 ; R18.2@1271.38,748.43 1335.94,812.99 1390.15,812.99 1404.72,827.56 R20.2@1404.72,862.2 1500,862.2 1522.44,839.76 ; C37.1@1490.16,77.96 1503.66,91.46 C23.2@1554.33,91.46 ; L1.2@1497.24,913.78 1522.44,888.58 1522.44,839.76 ; U3.11@1498.42,444.49 1552.36,444.49 1565.35,457.48 1565.35,505.91 ; U3.8@1498.42,503.54 1560.63,503.54 1562.99,505.91 ; U3.4@1498.42,582.28 1551.18,582.28 ; v1(1584.25,57.08) 1569.29,57.08 1554.33,72.05 C23.2@1554.33,91.46 ; v1(1605.91,505.91) 1565.35,505.91 ; U3.17@1644.09,357.87 1644.09,396.46 1637.01,403.54 1610.63,403.54 1604.72,397.64 U3.15@1604.72,357.87 1605.91,356.69 v1(1605.91,281.89) 1705.51,281.89 1722.83,299.21 U3.21@1722.83,357.87 ; C19.2@1798.43,91.85 1797.64,91.06 C20.2@1738.19,91.06 1737.91,90.79 C21.2@1676.77,90.79 C22.2@1614.96,90.79 1614.29,91.46 C23.2@1554.33,91.46 ; 1522.44,839.76 1522.44,681.5 1551.18,652.75 1551.18,582.28 ; 1551.18,582.28 1565.35,568.11 1565.35,508.27 1562.99,505.91 ; 1562.99,505.91 1565.35,505.91
  Mid Layer 2 w7.87: v1(1218.11,651.97) 1218.11,726.1 v1(1223.11,731.1)
  Bottom Layer w7.87: v1(1584.25,57.08) 1584.25,100.39 1605.91,122.05 v1(1605.91,281.89) v1(1605.91,505.91)
ACTLED: R28.2 U3.27 | length 571.8
  Top Layer w7.87: R28.2@1355.12,275.59 1407.48,275.59 1596.06,464.17 U3.27@1848.82,464.17
BOOT0: R7.2 U4.60 | length 186.1
  Top Layer w7.87: U4.60@1828.34,1694.09 1828.34,1664.18 1861.02,1631.5 1931.5,1631.5 R7.2@1959.45,1603.54
CLK_L: J2.4 U4.9 | length 2389.4
  Top Layer w7.87: U4.9@1985.82,1930.31 2165.35,1930.31 2189.46,1954.42 v1(2189.46,1958.27)
  Bottom Layer w7.87: v1(2189.46,1958.27) 2216.73,1958.27 2236.22,1938.78 2236.22,1416.84 2164.58,1345.2 2164.58,1013.58 2102,951 2102,222.71 2169.99,154.72 2337.8,154.72 2371.97,188.9 J2.4@2371.97,222.09
CS: J1.2 U4.41 | length 798.6
  Top Layer w7.87: U4.41@1533.07,1910.63 1586.61,1910.63 v1(1599.61,1897.64) ; v1(1542.52,1681.1) 1542.52,1239.49 J1.2@1574.25,1207.76
  Bottom Layer w7.87: v1(1542.52,1681.1) 1542.52,1840.55 v1(1599.61,1897.64)
CS_EE: R32.2 U4.24 U5.1 | length 611
  Top Layer w7.87: U5.1@1628.07,2593.7 R32.2@1565.41,2593.7 1565.41,2542.11 1544.88,2521.57 1544.88,2460.44 1675.98,2329.33 1675.98,2292.86 1769.29,2199.55 U4.24@1769.29,2146.85
CS_ETH: R21.1 U3.32 U4.40 | length 1988
  Top Layer w7.87: R21.1@1405.79,1933.07 1408.54,1930.31 U4.40@1533.07,1930.31 1750.12,1930.31 1946.57,1733.86 1977.5,1733.86 2052.56,1658.8 2052.56,686.03 1929.14,562.6 U3.32@1848.82,562.6
GND: C1.2 C2.1 C3.2 C4.2 C5.2 C6.1 C7.1 C8.1 C9.1 C10.2 C11.1 C12.1 C13.1 C14.2 C15.1 C16.1 C17.1 C18.1 C19.1 C20.1 C21.1 C22.1 C23.1 C24.1 C25.2 C26.1 C28.1 C29.1 C31.1 C32.1 C33.1 C34.1 C35.2 C36.2 C37.2 C38.2 C39.2 C40.1 C41.1 C42.1 C43.1 C44.1 C46.1 C47.2 C48.1 C49.2 J2.5 LED1.2 P1.4 P2.3 P2.4 P4.4 pad.3@2262.17,75.94 Q1.2 R6.1 R7.1 R9.2 R10.2 R11.2 R12.2 R13.2 R23.1 R27.1 R33.2 R35.1 R37.1 R43.1 R45.1 R47.1 R48.1 R50.1 R51.2 SWD1.5 U1.1 U2.8 U3.3 U3.9 U3.14 U3.16 U3.19 U3.29 U3.48 U4.12 U4.18 U4.28 U4.31 U4.47 U4.63 U5.4 U6.25 Y1.2 Y1.4 | length 9459
  Top Layer w7.87: C24.1@1161.81,803.03 1212.87,803.03 1299.21,889.37 1299.21,1387.4 1337.72,1425.91 P1.4@1382.87,1425.91 ; C32.1@1243.7,100.39 1285.28,100.39 1297.36,88.31 R23.1@1329.13,88.31 R13.2@1391,88.31 1448.48,145.79 1490.16,145.79 ; C31.1@1330.98,346.06 1396.85,346.06 v1(1401.57,350.79) ; C8.1@1370.47,1810.91 1452.09,1810.91 1470.47,1792.52 U4.47@1533.07,1792.52 1556.83,1792.52 1568.11,1781.24 1568.11,1596.46 ; v1(1394.09,445.28) 1394.09,450.79 1427.17,483.86 U3.9@1498.42,483.86 ; v1(1415.35,586.61) 1415.35,595.28 1422.05,601.97 U3.3@1498.42,601.97 ; C37.2@1490.16,200 1490.16,145.79 ; C7.1@1493.31,2330.32 1493.94,2330.95 v1(1538.42,2330.95) ; v1@1538.18,2330.71 C6.1@1585.83,2330.71 1610.73,2330.71 1631.49,2309.95 U4.31@1631.49,2146.85 ; C23.1@1554.33,146.46 1554.33,263.72 1585.04,294.43 U3.14@1585.04,357.87 1585.04,401.97 1600.39,417.32 1661.42,417.32 1683.46,395.28 U3.19@1683.46,357.87 1683.46,311.81 1670.87,299.21 1633.86,299.21 1624.41,308.66 U3.16@1624.41,357.87 ; U3.48@1565.35,708.27 1565.35,662.99 1591.73,636.61 v1(1612.6,636.61) ; v1(1590.55,1361.42) 1568.11,1383.86 1568.11,1596.46 ; LED1.2@1626.38,1534.65 1626.38,1538.19 1568.11,1596.46 ; U5.4@1628.07,2443.7 1643.82,2443.7 1684.52,2484.4 1684.52,2495.95 1717.34,2528.77 1717.34,2581.32 1766.61,2630.59 1959.09,2630.59 C14.2@1989.71,2599.97 v1(2068.35,2599.97) ; C44.1@1635.9,3092.08 1641.18,3097.36 v1(1669.8,3097.36) ; R12.2@1661.42,866.93 v1@1692.67,866.93 ; U4.28@1690.55,2146.85 1690.55,2108.67 v1(1717.72,2081.5) ; v1(1692.19,867.28) 1721.97,867.28 R11.2@1722.44,866.81 1781.1,866.81 R10.2@1782.28,867.99 R9.2@1840.94,867.99 ; C3.2@1729.92,1201.97 1769.24,1162.65 1924.29,1162.65 1935.43,1173.79 ; C11.1@1765.35,2328.74 1833.86,2328.74 C10.2@1834.25,2329.14 1837,2331.89 1861.02,2331.89 ; v2(1814.17,1821.26) 1887.4,1748.04 U4.63@1887.4,1694.09 ; U3.29@1848.82,503.54 1903.94,503.54 C25.2@2107.08,300.39 ; U4.18@1887.4,2146.85 1887.4,2305.52 1861.02,2331.89 ; C4.2@1909.05,1430.73 1953.44,1430.73 v1(1957.2,1426.97) ; U1.1@1935.43,1262.99 1935.43,1173.79 ; v1(1957.08,1100) 1957.08,1152.14 1935.43,1173.79 ; U4.12@1985.82,1989.37 2083.07,1989.37 C9.1@2107.09,2013.39 2160.24,2066.54 v1(2160.24,2098.43) ; v1(2014.17,1565.35) 2014.17,1567.72 2014.45,1567.99 R7.1@2014.45,1603.54 ; v4(2096.06,1024.41) 2111.31,1039.66 Q1.2@2111.31,1079.64 ; C25.2@2107.08,312.2 C25.2@2107.08,300.39 ; C29.1@2107.6,409.45 2101.18,415.87 Y1.2@2101.18,491.73 2101.18,494.48 2137.8,531.1 2137.8,544.1 2164.18,570.48 Y1.4@2164.18,578.35 Y1.4@2162.48,580.05 ; R35.1@2110.92,1210.23 v1(2110.92,1279.03) ; C5.2@2146.96,2380.32 2151.09,2384.46 C5.2@2163.49,2372.05 2166.12,2369.42 v1(2224.12,2369.42) ; C16.1@2196.73,1547.64 2196.73,1660.63 2242.4,1706.3 2410.41,1706.3 2461.02,1655.68 v1(2461.02,1509.45) 2461.02,1426.97 C2.1@2462.09,1425.91 2462.09,1393.15 2460.88,1393.15 2421.02,1353.29 C12.1@2421.02,1347.39 ; C17.1@2199.09,1857.87 2231.89,1857.87 2324.02,1950 v1(2324.02,2001.57) ; SWD1.5@2203.54,2965.55 2203.54,2631.95 2029.86,2458.27 R33.2@1953.66,2458.27 1953.66,2376.5 1909.06,2331.89 1861.02,2331.89 ; pad.3@2262.17,75.94 2262.17,137.44 2188.19,211.42 C26.1@2108.54,211.42 ; J2.5@2321.97,272.09 J2.5@2321.97,285.51 ; C35.2@2364.93,2351.46 2367.2,2353.73 C36.2@2435.63,2353.73 ; v1(2398.37,2399.38) 2402.13,2395.61 2402.13,2388.1 C36.2@2438.78,2351.46 ; U2.8@2404.13,1019.49 2404.13,957.56 v1(2462.09,899.61) ; 1490.16,145.79 C22.1@1614.96,145.79 C21.1@1676.77,145.79 1677.05,146.06 C20.1@1738.19,146.06 1738.98,146.85 C19.1@1798.43,146.85 1855.39,89.88 C34.1@1861.02,89.88 1918.11,89.88 R27.1@1918.9,90.67 1991.61,90.67 2001.34,100.39 C33.1@2025.2,100.39 2065.23,100.39 2108.54,143.7 C26.1@2108.54,211.42 ; C25.2@2107.08,300.39 2108.54,298.93 C26.1@2108.54,211.42
  Top Layer w15: v1(208,2830.48) 208.76,2831.24 275.24,2831.24 R37.1@276,2832 ; v1(208,2889.69) R43.1@250,2889.69
  Bottom Layer w7.87: P4.4@2000.93,2783.65 2000.93,2667.39 v1(2068.35,2599.97)
  Bottom Layer w23.62: P2.3@2361.42,494.88 P2.4@2361.42,544.88
  other v1: 1912.6,2335.43 1196.83,2496.27 1270,2496.27 1347.86,2553.72 1411,2553.31 1142.48,2561.6 418,2672 283,2691.79 332,2691.79 1314.57,2830.48 1467,2830.48 1314.57,2872.13 1467,2872.13 919,2885.6 617.47,2929.52 679.77,2929.52 919,2961.95 648.62,2972.51 617.47,3015.49 679.77,3015.49 270.26,3054.58
  other v2: 2468.74,447.32 2468.74,494.57 2468.74,541.81 2468.74,589.06 2468.74,636.3
GNDA: C32.2 P3.1 P3.2 | length 1866.9
  Top Layer w7.87: P3.2@291.73,451.97 238.19,398.43 238.19,223.62 402.76,59.06 1082.29,59.06 1123.62,100.39 C32.2@1157.08,100.39
  Bottom Layer w7.87: P3.2@291.73,451.97 P3.1@903.94,451.97
HOLD_EE: U4.20 U5.7 | length 541.3
  Top Layer w7.87: U5.7@1840.67,2543.7 1801.3,2543.7 1727.36,2469.76 1727.36,2267.82 1781.55,2213.62 1823.38,2213.62 1848.03,2188.98 U4.20@1848.03,2146.85
IRQ: J2.8 U4.11 | length 2142
  Top Layer w7.87: U4.11@1985.82,1969.68 2107.3,1969.68 2167.13,2029.51 v1(2167.13,2037.8)
  Bottom Layer w7.87: v1(2167.13,2037.8) 2221.65,2037.8 2280.31,1979.13 2280.31,1181.38 2236.22,1137.28 2236.22,257.83 J2.8@2271.97,222.09
LD_PWR_G: U4.38
LD_PWR_R: U4.37
LED1: P1.5 U4.56 | length 1560
  Top Layer w7.87: U4.56@1749.6,1694.09 1749.6,1752.36 1778.32,1781.07 v1(1807.09,1781.07)
  Bottom Layer w7.87: P1.5@1432.87,1475.91 1494.96,1475.91 1506.69,1464.17 1506.69,1116.14 1552.36,1070.47 1675.2,1070.47 1727.44,1122.72 1855.51,1250.79 1855.51,1754.67 1829.11,1781.07 v1(1807.09,1781.07)
LED2: P1.6 U4.57 | length 1558.7
  Top Layer w7.87: U4.57@1769.29,1694.09 1769.29,1729.19 1790.49,1750.39 v1(1826.38,1750.39)
  Bottom Layer w7.87: P1.6@1382.87,1475.91 1382.87,1500.98 1416.54,1534.65 1507.48,1534.65 1524.8,1517.32 1524.8,1124.02 1556.3,1092.52 1662.2,1092.52 1826.38,1256.69 v1(1826.38,1750.39)
LINKLED: R26.2 U3.25 | length 593.5
  Top Layer w7.87: R26.2@1352.36,203.15 1361.28,203.15 1589.23,431.1 1793.31,431.1 1799.61,424.8 U3.25@1848.82,424.8
MISO: J1.1 U4.22 | length 1199.4
  Top Layer w7.87: U4.22@1808.66,2146.85 1808.66,2002.37 v1(1814.17,1996.85)
  Bottom Layer w7.87: J1.1@1574.25,1157.76 1574.25,1142.52 1600.63,1116.14 1644.09,1116.14 1783.46,1255.51 1783.46,1966.14 v1(1814.17,1996.85)
MISO_EE: U4.35 U5.2 | length 683.8
  Top Layer w7.87: U4.35@1533.07,2028.74 1585.83,2028.74 v1(1599.61,2014.96) ; U5.2@1628.07,2543.7 1675.7,2543.7 v1(1677,2545)
  Bottom Layer w7.87: v1(1599.61,2014.96) 1599.61,2375.88 1677,2453.28 v1(1677,2545)
MISO_ETH: U3.34 U4.52 | length 1428.1
  Top Layer w7.87: U4.52@1670.86,1694.09 1670.86,1614.57 1707.09,1578.35 1874.41,1578.35 2009.26,1443.5 2009.26,708.86 1902.36,601.97 U3.34@1848.82,601.97
MOSI: J1.4 U4.23 | length 1020.5
  Top Layer w7.87: v1(1772.05,2060.24) 1772.05,2061.81 1788.97,2078.74 U4.23@1788.97,2146.85
  Bottom Layer w7.87: J1.4@1624.25,1207.76 1646.73,1207.76 1753.94,1314.96 1753.94,2042.13 v1(1772.05,2060.24)
MOSI_EE: U4.36 U5.5 | length 693.3
  Top Layer w7.87: U4.36@1533.07,2009.05 1565.41,2009.05 1592.98,1981.49 v1(1634.64,1981.49) ; v1(1792,2442) 1826.32,2442 1833.56,2449.24 1839.88,2442.91 U5.5@1840.67,2443.7
  Bottom Layer w7.87: v1(1634.64,1981.49) 1657.48,2004.33 1657.48,2261.06 1792,2395.58 v1(1792,2442)
MOSI_ETH: U3.35 U4.53 | length 1721.9
  Top Layer w7.87: U4.53@1690.55,1694.09 1690.55,1768.9 1662.2,1797.24 1600.79,1797.24 1584.65,1781.1 1584.65,1645.67 1671.26,1559.06 1866.14,1559.06 1988.78,1436.41 1988.78,721.07 1889.37,621.65 U3.35@1848.82,621.65
NetC5_1: C5.1 C9.2 L2.2 U4.13 | length 449.4
  Top Layer w7.87: U4.13@1985.82,2009.05 2033.49,2009.05 2092.82,2068.39 C9.2@2107.09,2068.39 2107.09,2135 2083.35,2158.74 L2.2@2083.35,2276.89 2154.95,2276.89 C5.1@2163.49,2285.43 C5.1@2164.57,2284.36
NetC18_2: C18.2 R29.2 X1.1 | length 350.4
  Top Layer w7.87: C18.2@2139.76,1658.66 2139.76,1681.5 2199.09,1740.83 R29.2@2199.09,1767.32 ; R29.2@2196.2,1770.22 2297.78,1770.22 X1.1@2379.53,1851.97
NetC24_2: C24.2 P3.R3 R20.1 | length 1080.8
  Top Layer w7.87: P3.R3@672.83,581.89 643.31,581.89 579.92,645.28 579.92,741.34 641.73,803.15 1106.69,803.15 C24.2@1161.81,748.03 1195.75,748.03 1309.92,862.2 R20.1@1349.72,862.2
NetC31_2: C31.2 R24.1 R25.1 | length 359.8
  Top Layer w7.87: v1(1219.29,431.89) 1228.74,431.89 1259.45,462.6 R24.1@1270.08,462.6 ; v1(1219.29,552.76) R25.1@1270.47,552.76 R25.1@1270.08,552.36 ; v1@1224.8,374.41 v1(1224.41,374.02) 1252.36,346.06 C31.2@1275.98,346.06
  Mid Layer 2 w7.87: v1@1224.02,374.41 v1(1224.41,374.02)
  Bottom Layer w7.87: v1(1219.29,552.76) v1(1219.29,431.89) 1219.29,379.13 v1@1224.02,374.41
NetC33_2: C33.2 U3.20 | length 529.5
  Top Layer w7.87: U3.20@1703.15,357.87 1703.15,400.79 1711.42,409.06 1803.54,409.06 1820.08,392.52 1820.08,296.85 1961.54,155.39 C33.2@2025.2,155.39
NetC34_2: C34.2 U3.22 | length 262.1
  Top Layer w7.87: U3.22@1742.52,357.87 1742.52,292.52 1861.02,174.02 C34.2@1861.02,144.88
NetC35_1: C35.1 U4.4 Y2.1 | length 1089.6
  Top Layer w7.87: v1(1887.4,1971.52) 1887.4,1896.85 1952.36,1831.89 U4.4@1985.82,1831.89 ; C35.1@2364.93,2296.46 2364.93,2263.09 v1(2338.84,2237.01) 2382.68,2193.17 Y2.1@2382.68,2146.06
  Bottom Layer w7.87: v1(1887.4,1971.52) 1887.4,2225.63 1898.78,2237.01 v1(2338.84,2237.01)
NetC36_1: C36.1 U4.3 Y2.2 | length 1499.8
  Top Layer w7.87: v1(1863.78,1919.68) 1863.78,1896.06 1947.64,1812.2 U4.3@1985.82,1812.2 ; v1(2324.02,2451.18) 2418.5,2451.18 2475.98,2393.7 2475.98,2311.02 2461.42,2296.46 C36.1@2438.78,2296.46 2438.78,2149.02 Y2.2@2441.73,2146.06
  Bottom Layer w7.87: v1(1863.78,1919.68) 1863.78,2236.61 2027.56,2400.39 2057.09,2400.39 2162.49,2400.39 2213.28,2451.18 v1(2324.02,2451.18)
NetC40_2: C40.2 Q2.1 Q2.2 Q2.3 R30.1 U6.6 | length 624.9
  Top Layer w7.87: U6.6@723.42,3011.88 752.89,3011.88 768.5,3027.49 932.15,3027.49 966.25,2993.39 966.25,2852.65 996.59,2822.32 R30.1@1107.9,2822.32 ; R30.1@1108.02,2822.2 1155.09,2775.13
NetC45_2: C45.2 C49.1 U6.9 | length 69.8
  Top Layer w7.87: U6.9@668.3,3067 668.53,3067.23 668.53,3086.43 681.86,3099.75 v1(713.29,3099.75)
NetC48_2: C48.2 U6.17 | length 254.9
  Top Layer w10: C48.2@341.5,3007.45 400.69,3007.45 455.32,2952.83 U6.17@573.82,2952.83
NetL3_1: L3.1 U6.21 U6.22
NetLED1_1: LED1.1 R3.2 | length 105.3
  Top Layer w7.87: LED1.1@1626.38,1471.65 1680.32,1525.59 1708.27,1525.59 R3.2@1709.06,1526.38
NetLED2_1: LED2.1 R40.1 | length 140.7
  Top Layer w7.87: R40.1@1624.4,3049.33 1667.72,3049.33 1696.98,3078.59 1735.5,3078.59 1741.41,3084.5 LED2.1@1741.41,3093.59
NetLED2_2: LED2.2 TP3.1 U6.13 | length 3091
  Top Layer w10: v1(521.35,3073.54) 521.35,3047.24 537.02,3031.57 U6.13@573.82,3031.57 ; LED2.2@1800.47,3093.59 1800.47,3097.43 1805.31,3102.27 v1(2009.71,3102.27)
  Mid Layer 2 w10: v1(50,3079.4) 19.98,3049.38 19.98,2963.13 30.93,2952.18 66,2952.18 141.83,3028 427.42,3028 472.96,3073.54 v1(521.35,3073.54)
  Bottom Layer w10: v1(521.35,3073.54) 557.81,3037.09 557.81,2793.5 596.05,2755.26 1070.44,2755.26 1103.55,2788.37 1103.55,2931.16 1134.73,2962.34 1937.24,2962.34 1991.41,3016.51 2036.38,3016.51 2049.78,3029.91 2049.78,3090.33 2037.83,3102.27 v1(2009.71,3102.27)
NetLED3_1: LED3.1 R41.1 | length 127
  Top Layer w7.87: R41.1@1624.4,2970.93 1627.9,2974.43 1735.5,2974.43 1741.41,2980.33 LED3.1@1741.41,2986.43
NetLED3_2: LED3.2 TP2.1 U6.14 | length 2802.2
  Top Layer w10: v1(487.24,3045.89) 521.25,3011.88 U6.14@573.82,3011.88 ; LED3.2@1800.47,2986.43 v1(2009.71,2986.43)
  Mid Layer 2 w10: v1(50,2885.6) 50,2908.7 148.83,3007.53 448.87,3007.53 v1(487.24,3045.89)
  Bottom Layer w10: v1(487.24,3045.89) 533.21,2999.92 533.21,2778.04 580.18,2731.07 1082.61,2731.07 1126.8,2775.26 1126.8,2922.93 1144.37,2940.5 1963.78,2940.5 v1(2009.71,2986.43)
NetLED4_1: LED4.1 R42.1 | length 134.7
  Top Layer w7.87: R42.1@1624.4,3010.13 1677.13,3010.13 1692.07,3025.07 1735.5,3025.07 1741.41,3030.98 LED4.1@1741.41,3040.01
NetLED4_2: LED4.2 TP1.1 U6.11 | length 2790.2
  Top Layer w7.87: v1(583.94,3099.75) 615.38,3099.75 628.7,3086.43 628.7,3067.23 U6.11@628.93,3067
  Top Layer w10: LED4.2@1800.47,3040.01 1800.47,3043.02 1805.31,3047.87 v1(2009.71,3047.87)
  Mid Layer 2 w10: v1(50,2982.5) 167.25,3099.75 v1(583.94,3099.75)
  Bottom Layer w10: v1(583.94,3099.75) 583.94,2806.06 612.92,2777.08 1055.09,2777.08 1081.79,2803.78 1081.79,2940.34 1123.56,2982.11 1916.23,2982.11 1981.99,3047.87 v1(2009.71,3047.87)
NetP3_L2: P3.L2 R26.1 | length 913.9
  Top Layer w7.87: P3.L2@448.82,138.98 495.67,92.13 953.15,92.13 1064.17,203.15 R26.1@1297.36,203.15
NetP3_L4: P3.L4 R28.1 | length 509.9
  Top Layer w7.87: P3.L4@846.85,138.98 983.46,275.59 R28.1@1300.12,275.59
NetQ1_1: Q1.1 R34.2 R35.2 | length 148.5
  Top Layer w7.87: R35.2@2110.92,1155.23 R34.2@2182.23,1155.23 2182.23,1083.52 Q1.1@2186.11,1079.64
NetQ1_3: Q1.3 R2.1 U2.2 | length 475.1
  Top Layer w7.87: Q1.3@2148.71,1000.9 2148.71,1003.62 2158.6,1003.62 2253.15,1098.17 2333.15,1098.17 2354.13,1119.15 U2.2@2354.13,1214.37
  Top Layer w15.75: R2.1@2120.76,888.58 2120.76,970.23 2148.71,998.19 Q1.3@2148.71,1000.9
NetQ2_4: Q2.4 Q3.4 U6.15 | length 1358.1
  Top Layer w10: v1(487.24,3005.57) 488.5,3005.57 501.88,2992.2 U6.15@573.82,2992.2
  Top Layer w12: v1(990.96,2699.51) 990.96,2729.93 1005.03,2744 Q2.4@1052.33,2744 ; Q3.4@1130.28,2913.41 1130.28,2911.82 1132.26,2909.85 v1(1158.85,2909.85)
  Bottom Layer w10: v1(487.24,3005.57) 487.24,2746.1 533.82,2699.51 1119.1,2699.51 1158.85,2739.26 v1(1158.85,2909.85)
NetQ3_1: Q3.1 Q3.2 Q3.3 R30.2 U6.7 | length 541.5
  Top Layer w7.87: U6.7@723.42,3031.57 751.58,3031.57 761.58,3041.57 941.52,3041.57 981.96,3001.13 981.96,2858.72 1000.69,2839.99 1086.92,2839.99 R30.2@1091.81,2844.88
NetR4_2: R4.2 U2.1 | length 109.6
  Top Layer w7.87: U2.1@2400.2,1214.37 U2.1@2404.13,1214.37 2433.55,1214.37 2470.36,1177.56 2470.36,1156.29 R4.2@2472.44,1154.21
NetR5_1: R5.1 R6.2 U2.7 | length 297.8
  Top Layer w11.81: U2.7@2354.13,1019.49 2354.13,948.82 2361.61,941.34 R5.1@2361.61,888.58 2398.24,888.58 2433.55,853.27 R6.2@2433.55,776.07
NetR9_1: R9.1 U3.38 | length 157.4
  Top Layer w7.87: U3.38@1762.2,708.27 1762.2,743.7 1790.55,772.05 1824.8,772.05 1840.94,788.19 R9.1@1840.94,812.99
NetR10_1: R10.1 U3.39 | length 121.2
  Top Layer w7.87: U3.39@1742.52,708.27 1742.52,773.23 R10.1@1782.28,812.99
NetR11_1: R11.1 U3.40 | length 103.7
  Top Layer w7.87: R11.1@1722.44,811.81 1722.83,811.42 U3.40@1722.83,708.27
NetR12_1: R12.1 U3.41 | length 120.9
  Top Layer w7.87: R12.1@1661.42,811.93 1703.15,770.19 U3.41@1703.15,708.27
NetR13_1: R13.1 U3.42 | length 686.1
  Top Layer w7.87: R13.1@1391,143.31 1433.01,185.31 1433.01,237.38 1525.98,330.35 v1(1525.98,331.89) ; v1(1683.07,638.58) 1683.07,707.88 U3.42@1683.46,708.27
  Bottom Layer w7.87: v1(1525.98,331.89) 1525.98,481.5 v1(1683.07,638.58)
NetR23_2: R23.2 U3.10 | length 422.8
  Top Layer w7.87: R23.2@1329.13,143.31 1340.55,143.31 v1(1401.57,204.33) ; v1(1429.53,400.79) 1429.92,401.18 1429.92,438.58 1455.51,464.17 U3.10@1498.42,464.17